# Altium PCB PCB.PcbDoc
Units mil, origin at the board's own origin, x right, y up, seen from the top; angles counter-clockwise.
Board outline 866.14 x 866.14 mil, 2 copper layers (Top Layer, Bottom Layer); 13 components, 10 nets, 43 pads, 22 vias.
Unrouted connection lines stored in the file: 39.
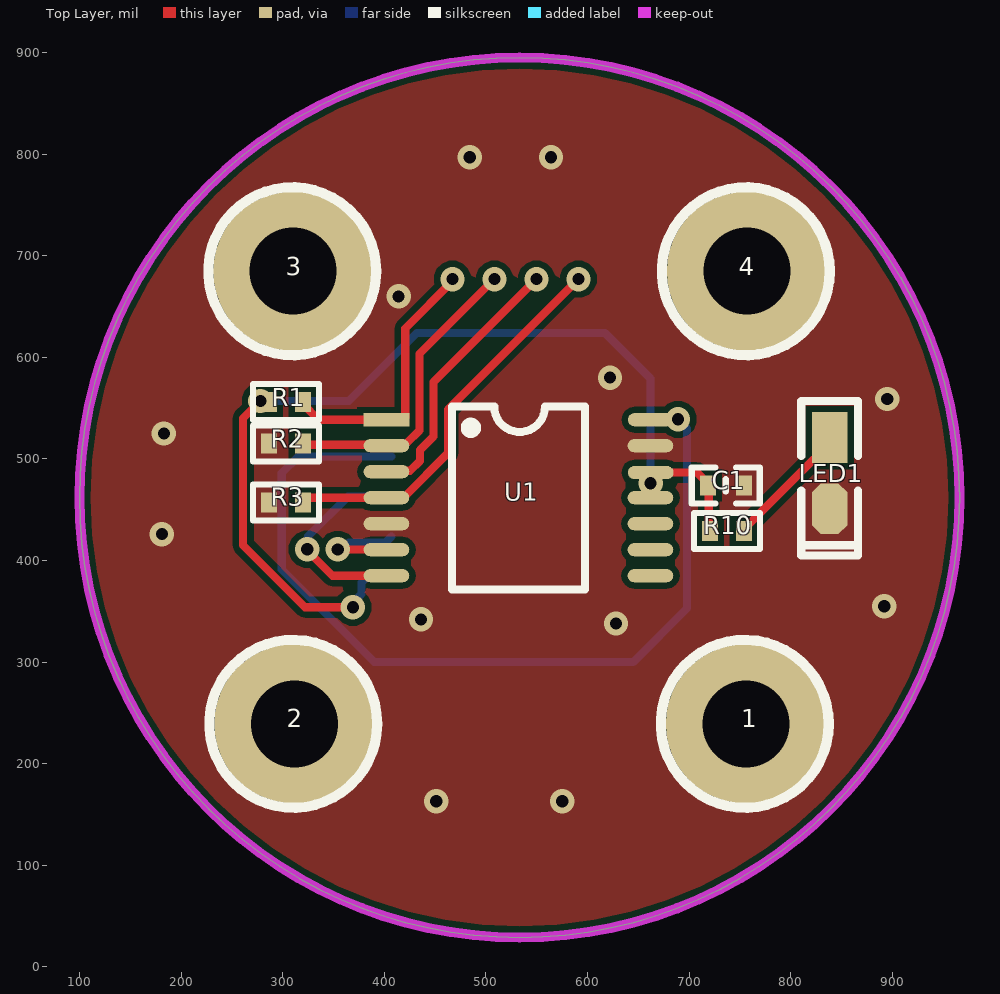
[diagram p0: Top Layer view]
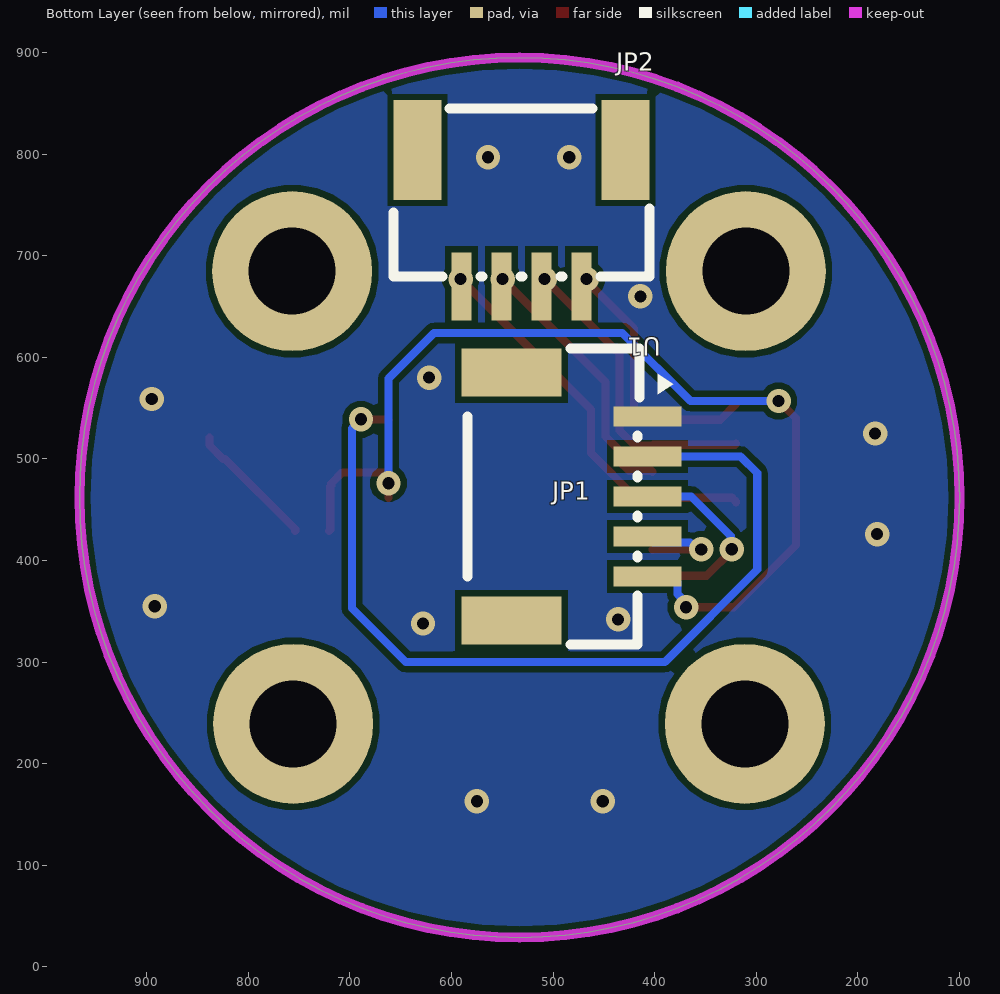
[diagram p1: Bottom Layer view, seen from below]
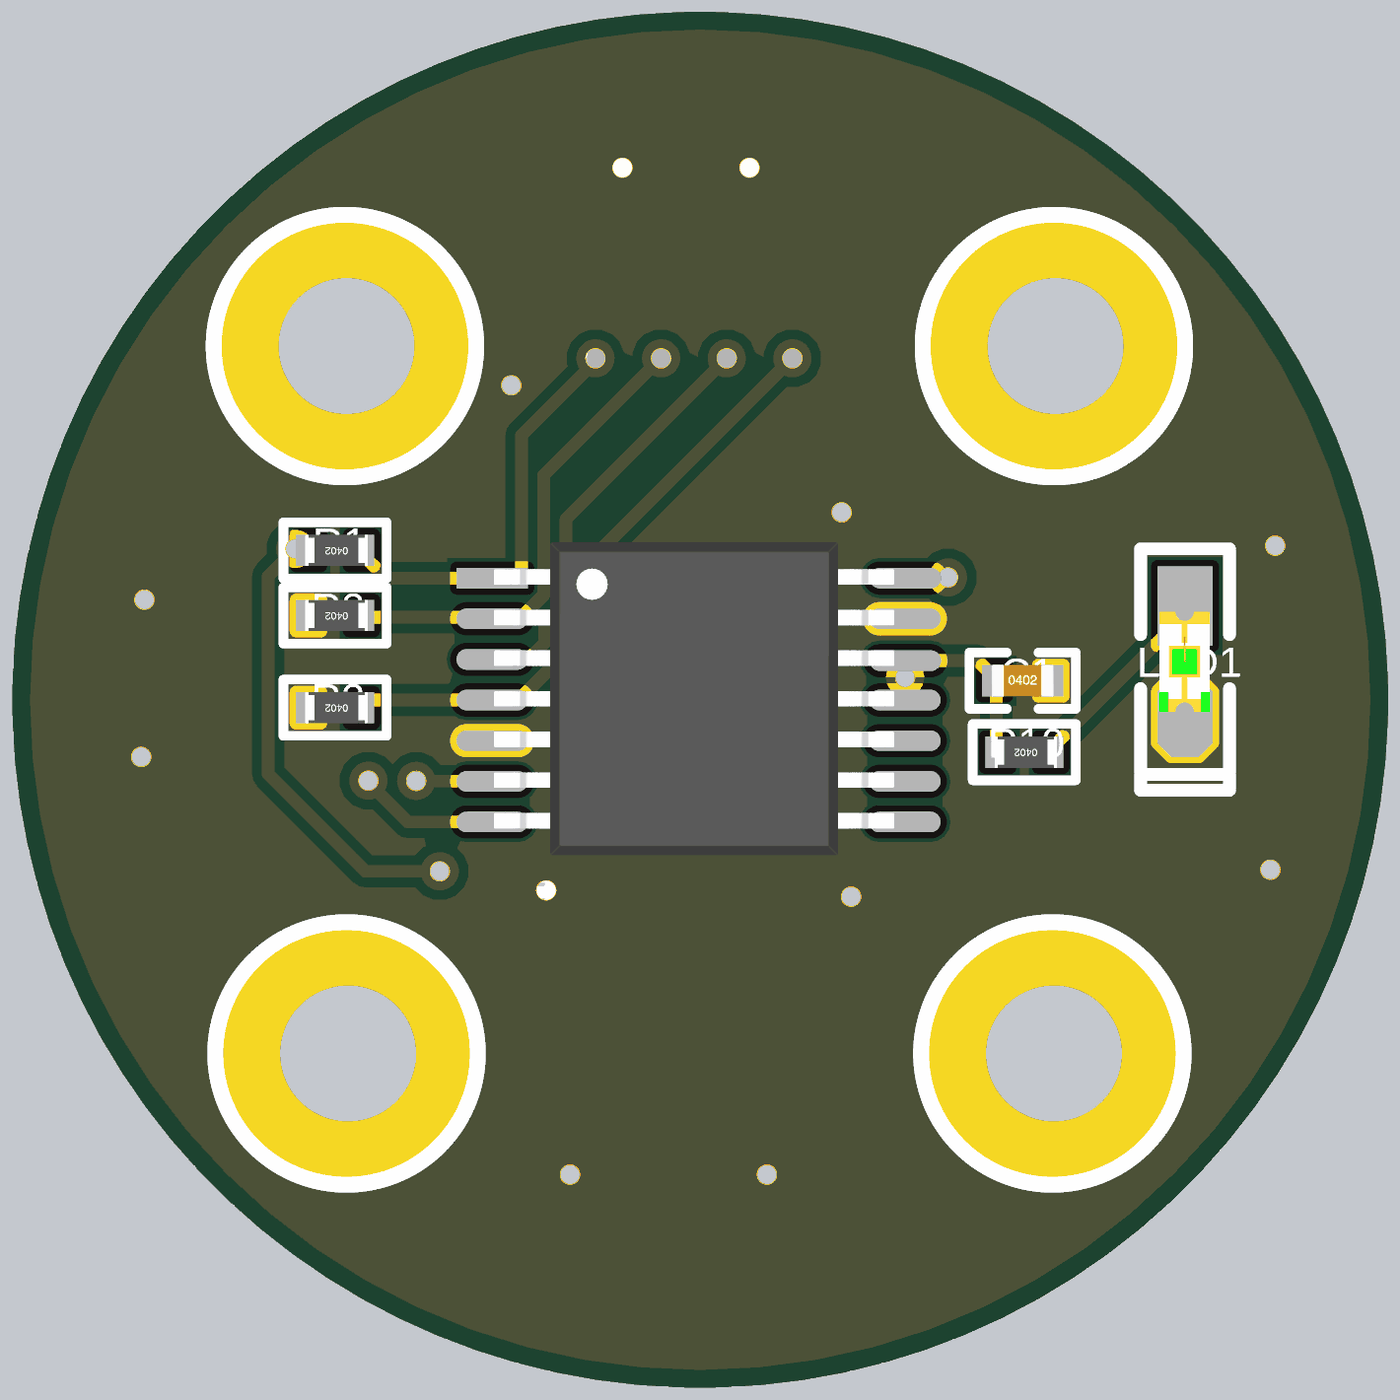
[diagram p2: 3D render of the assembled board from above, using the file's embedded part models]

## Layer stack, top to bottom
Top Solder: solder mask 0.4, Solder Resist, Dk 3.5
Top Layer: signal copper 1.4
Dielectric 1: dielectric 12.6, FR-4, Dk 4.8
Bottom Layer: signal copper 1.4
Bottom Solder: solder mask 0.4, Solder Resist, Dk 3.5

## Board outline
99.93,462 ccw(c533,462) 533,28.93 ccw(c533,462) 966.07,462 ccw(c533,462) 533,895.07 ccw(c533,462)

## Design rules (kind name [scope] priority, off if disabled: settings)
Clearance [All] p1: gap=6 ignorepadtopadclearanceinfootprint=TRUE
MinimumSolderMaskSliver [All] p1 off: minsoldermaskwidth=10
PolygonConnect PolygonConnect_1 [All] p1: connectstyle=Direct reliefconductorwidth=10 reliefentries=4 polygonreliefangle="90 Angle" airgapwidth=10
PolygonConnect [All] p2: connectstyle=Relief reliefconductorwidth=10 reliefentries=4 polygonreliefangle="90 Angle" airgapwidth=10
RoutingVias [All] p1: holewidth=28 width=50 viastyle="Through Hole" minholewidth=28 minwidth=50 maxholewidth=28 maxwidth=50
SilkToSilkClearance [All] p1 off: silktosilkclearance=10
SilkToSolderMaskClearance [IsPad] p1 off: minsilkscreentomaskgap=10 clearancetoexposedcopper=TRUE
SolderMaskExpansion [All] p1: expansion=4 istentingtop=FALSE
Width [All] p1: maxlimit=100 minlimit=4 preferedwidth=8
27 further rules are at their usual default settings.

## Components (designator, comment, footprint, x,y, rotation, side; value= is the part's Value field where it differs from the comment)
1 "M2" M2 754.71,239.29 r90 top
2 "M2" M2 310.29,239.29 r90 top
3 "M2" M2 309.29,684.71 r90 top
4 "M2" M2 755.71,684.71 r90 top
C1 "100nF/0402" 0402C 736,474 r0 top
JP1 "SH1.0-5" SH1.0-5P-P1.00 474,463 r270 bottom
JP2 "SH1.0-4" SH1.0-P1.00_-4P 531,737 r0 bottom
LED1 "电源指示灯" "LED 0603R" 838,486 r270 top
R1 "10K/0402" 0402R 304,556 r180 top
R2 "10K/0402" 0402R 304,515 r180 top
R3 "10K/0402" 0402R 304,457 r180 top
R10 "510R/0402" 0402R 738,429 r180 top
U1 "AS5047P" TSSOP-14 402,538.59 r0 top

## Footprints (in the part's own frame and the unit in brackets; to place one, negate y for a bottom-side part, rotate by r counter-clockwise, add the part's x,y. Pads: shape width x height; smd on the part's side, far side on the other; paste and mask are expansions set on the pad)
0402C [mm] "无极性贴片电容"
  rect 0.4x0.5 smd: 1(-0.45,0) 2(0.45,0)
  silkscreen extent -0.85,-0.45 0.85,0.45, body extent -0.5,-0.26 0.5,0.26, height 0.53
0402R [mm] "1/16W贴片电阻"
  rect 0.4x0.5 smd: 1(-0.4,0) 2(0.45,0)
  silkscreen extent -0.8,-0.45 0.85,0.45, body extent -0.5,-0.25 0.5,0.25, height 0.3
"LED 0603R" [mil] "红色0603LED"
  rect 50x35 smd: 1(-35,0.26)
  oct 50x35 smd: 2(35,0.26)
  silkscreen extent -71,-28 81,28, body extent -31,-16 31,16, height 18
M2 [mm] "M2铜柱"
  round 4 hole 2.175: 1(0,-0.025)
  silkscreen extent -2.1,-2.1 2.1,2.1
SH1.0-5P-P1.00 [mm]
  rect 0.5x1.7 smd paste+0 mask+0.05: 1(-2,1.7) 2(-1,1.7) 3(0,1.7) 4(1,1.7) 5(2,1.7)
  rect 1.2x2.5 smd paste+0 mask+0.05: 6(3.1,-1.7) 7(-3.1,-1.7)
  silkscreen extent -3.7,-2.8 3.7,2.34, body extent -3.68,-2.81 3.68,2.24, height 3.2
SH1.0-P1.00_-4P [mm]
  rect 0.5x1.7 smd paste+0 mask+0.05: 1(-1.5,1.705) 2(-0.5,1.705) 3(0.5,1.705) 4(1.5,1.705)
  rect 1.2x2.5 smd paste+0 mask+0.05: 5(-2.6,-1.705) 6(2.6,-1.705)
  silkscreen extent -3.2,-2.74 3.2,1.46, body extent -3.18,-2.74 3.18,2.31, height 3.2
TSSOP-14 [mm] "4.96x4.40x1.00 e=0.65（蒜米工坊）"
  rect 1.143x0.33 smd: 1(0,0)
  oval 1.143x0.33 smd: 2(0,-0.65) 3(0,-1.3) 4(0,-1.95) 5(0,-2.6) 6(0,-3.25) 7(0,-3.9) 8(6.6,-3.9) 9(6.6,-3.25) 10(6.6,-2.6) 11(6.6,-1.95) 12(6.608,-1.321) 13(6.6,-0.65) 14(6.608,0)
  silkscreen extent 1.63,-4.25 4.96,0.33, body extent 0.03,-4.43 6.43,0.57, height 1.03

## Part data
1 2 3 4: "铜柱孔", BOM名称=铜柱孔, 学习资源=www.ooocke.com, 版权归属=源创客
C1: library part C, "贴片电容", BOM名称=无极性贴片电容, 学习资源=www.ooocke.com, 版权归属=源创客
JP1: library part 5p_G, "5针排针", BOM名称=4P接插件, 学习资源=www.ooocke.com, 版权归属=源创客
JP2: library part 4p_G, "4针排针", BOM名称=4P接插件, 学习资源=www.ooocke.com, 版权归属=源创客
LED1: library part LED, "RED 蓝、红", PackageDocument=Feb-2002, LatestRevisionDate=17-Jul-2002, LatestRevisionNote="Re-released for DXP Platform.", PackageReference=3.2X1.6X1.1, Published=8-Jun-2000, Publisher="Altium Limited"
R1 R2 R3 R10: library part R, "贴片电阻", BOM名称=贴片电阻, 学习资源=www.ooocke.com, 版权归属=源创客
U1: library part AS5047, "增量式磁编码器"

## Via types
v1: diameter 24, hole 12, Top Layer to Bottom Layer, tented both sides, 22 vias

## Nets (pads, with @x,y where several pads share a name; then routed paths per layer and width w, separated by ;. In a path a pad name is that pad's centre, name@x,y a point inside that pad or via, vN(x,y) a via of type N, cw(c..) or ccw(c..) an arc to the next point about the centre after c; other vN are vias at no path point)
A: JP1.3 U1.7 | length 201
  Top Layer w8: v1(324.06,411.06) 324.06,409.86 348.87,385.05 U1.7
  Bottom Layer w8: v1(324.06,411.06) 325.06,412.06 325.06,424.06 364,463 JP1.3
B: JP1.4 U1.6 | length 106.2
  Top Layer w8: v1(354.11,410.93) 354.25,410.78 401.86,410.78 U1.6
  Bottom Layer w8: v1(354.11,410.93) 358.44,410.93 365.3,417.79 401.23,417.79 JP1.4
CLK: JP2.2 R2.1 U1.2 | length 301.5
  Top Layer w8: R2.1 320.8,513.96 401.04,513.96 U1.2 419.35,513 428.45,522.09 428.64,522.09 434.5,527.95 434.5,603.5 v1@508.17,677.17
  other v1: 508.33,677
CS: JP2.1 R1.1 U1.1 | length 264.7
  Top Layer w8: R1.1 319.75,554.03 335.19,538.59 U1.1 418.01,538.59 420.5,541.09 420.5,628.5 v1@468,676
  other v1: 467,677
GND: C1.2 JP1.1 LED1.2 R2.2 R3.2 U1.5 U1.13
  other v1: 451,163 575,163 628,338 436,342 892,355 181,426 183,525 895,559 622,580 414,660 484,797 564,797
I: JP1.2 U1.14 | length 885.2
  Top Layer w8: U1.14 662.36,538.8 688.8,538.8 v1(689,539)
  Bottom Layer w8: JP1.2 315.37,502.37 299,486 299,391 390,300 645,300 698,353 698,530 v1(689,539)
MISO: JP2.3 U1.3 | length 263.9
  Top Layer w8: U1.3 402.96,488.36 425.36,488.36 435,498 435,508.65 448.5,522.15 448.5,575.83 v1(549.67,677)
MOSI: JP2.4 R3.1 U1.4 | length 388
  Top Layer w8: R3.1 319.75,457.94 323.63,461.82 U1.4 418.62,461.82 462.5,505.7 462.5,548.5 v1(591,677)
NetLED1_1: LED1.1 R10.1 | length 128.2
  Top Layer w8: R10.1 753.75,430.97 822.77,500 824.76,500 838.26,513.5 LED1.1
VCC3V3: C1.1 JP1.5 R1.2 R10.2 U1.11 U1.12 | length 1008.8
  Top Layer w8: v1(278,557) 261,540 261,415 322,354 v1(369,354) ; U1.11 662,461.98 662,486.43 U1.12 707.66,486.59 718.28,475.97 C1.1 719.29,473 719.29,430 R10.2
  Bottom Layer w8: v1(278,557) 364.88,557 431.88,624 617,624 662,579 v1(662,476) ; v1(369,354) 369,358.33 377.61,366.94 377.61,378.42 383.45,384.26 JP1.5
pads on no net: 1.1 2.1 3.1 4.1 JP1.6 JP1.7 JP2.5 JP2.6 U1.8 U1.9 U1.10

## Polygon pours and split planes (outlines as drawn)
GND on Bottom Layer "GND_L02_P003" (solid, remove dead copper, pour order 3): -41,974 -41,-158 -23,-176 18,-135 1143,-135 1143,924 1063,1004
GND on Top Layer "GND_L01_P002" (solid, remove dead copper, pour order 2): -51,975 86,838 86,-46 992,-46 1021,-17 1021,994

## Keep-outs
Keep-Out Layer:
  circle w10: c533,462 r433.07

## Text inside footprints (layer, text, board x,y; h text height)
JP2: Bottom Overlay "U1" at 394.01,624.99 h30 r180